# Altium PCB DSP大板子.PcbDoc (part 6 of 9)
Units mil, origin at the board's own origin, x right, y up, seen from the top; angles counter-clockwise.
Board outline 7874.02 x 9055.12 mil, 4 copper layers (Top Layer, GND02, PWR03, Bottom Layer), stack 23.756 mil thick; 656 components, 360 nets, 1967 pads, 2623 vias.
Unrouted connection lines stored in the file: 70.
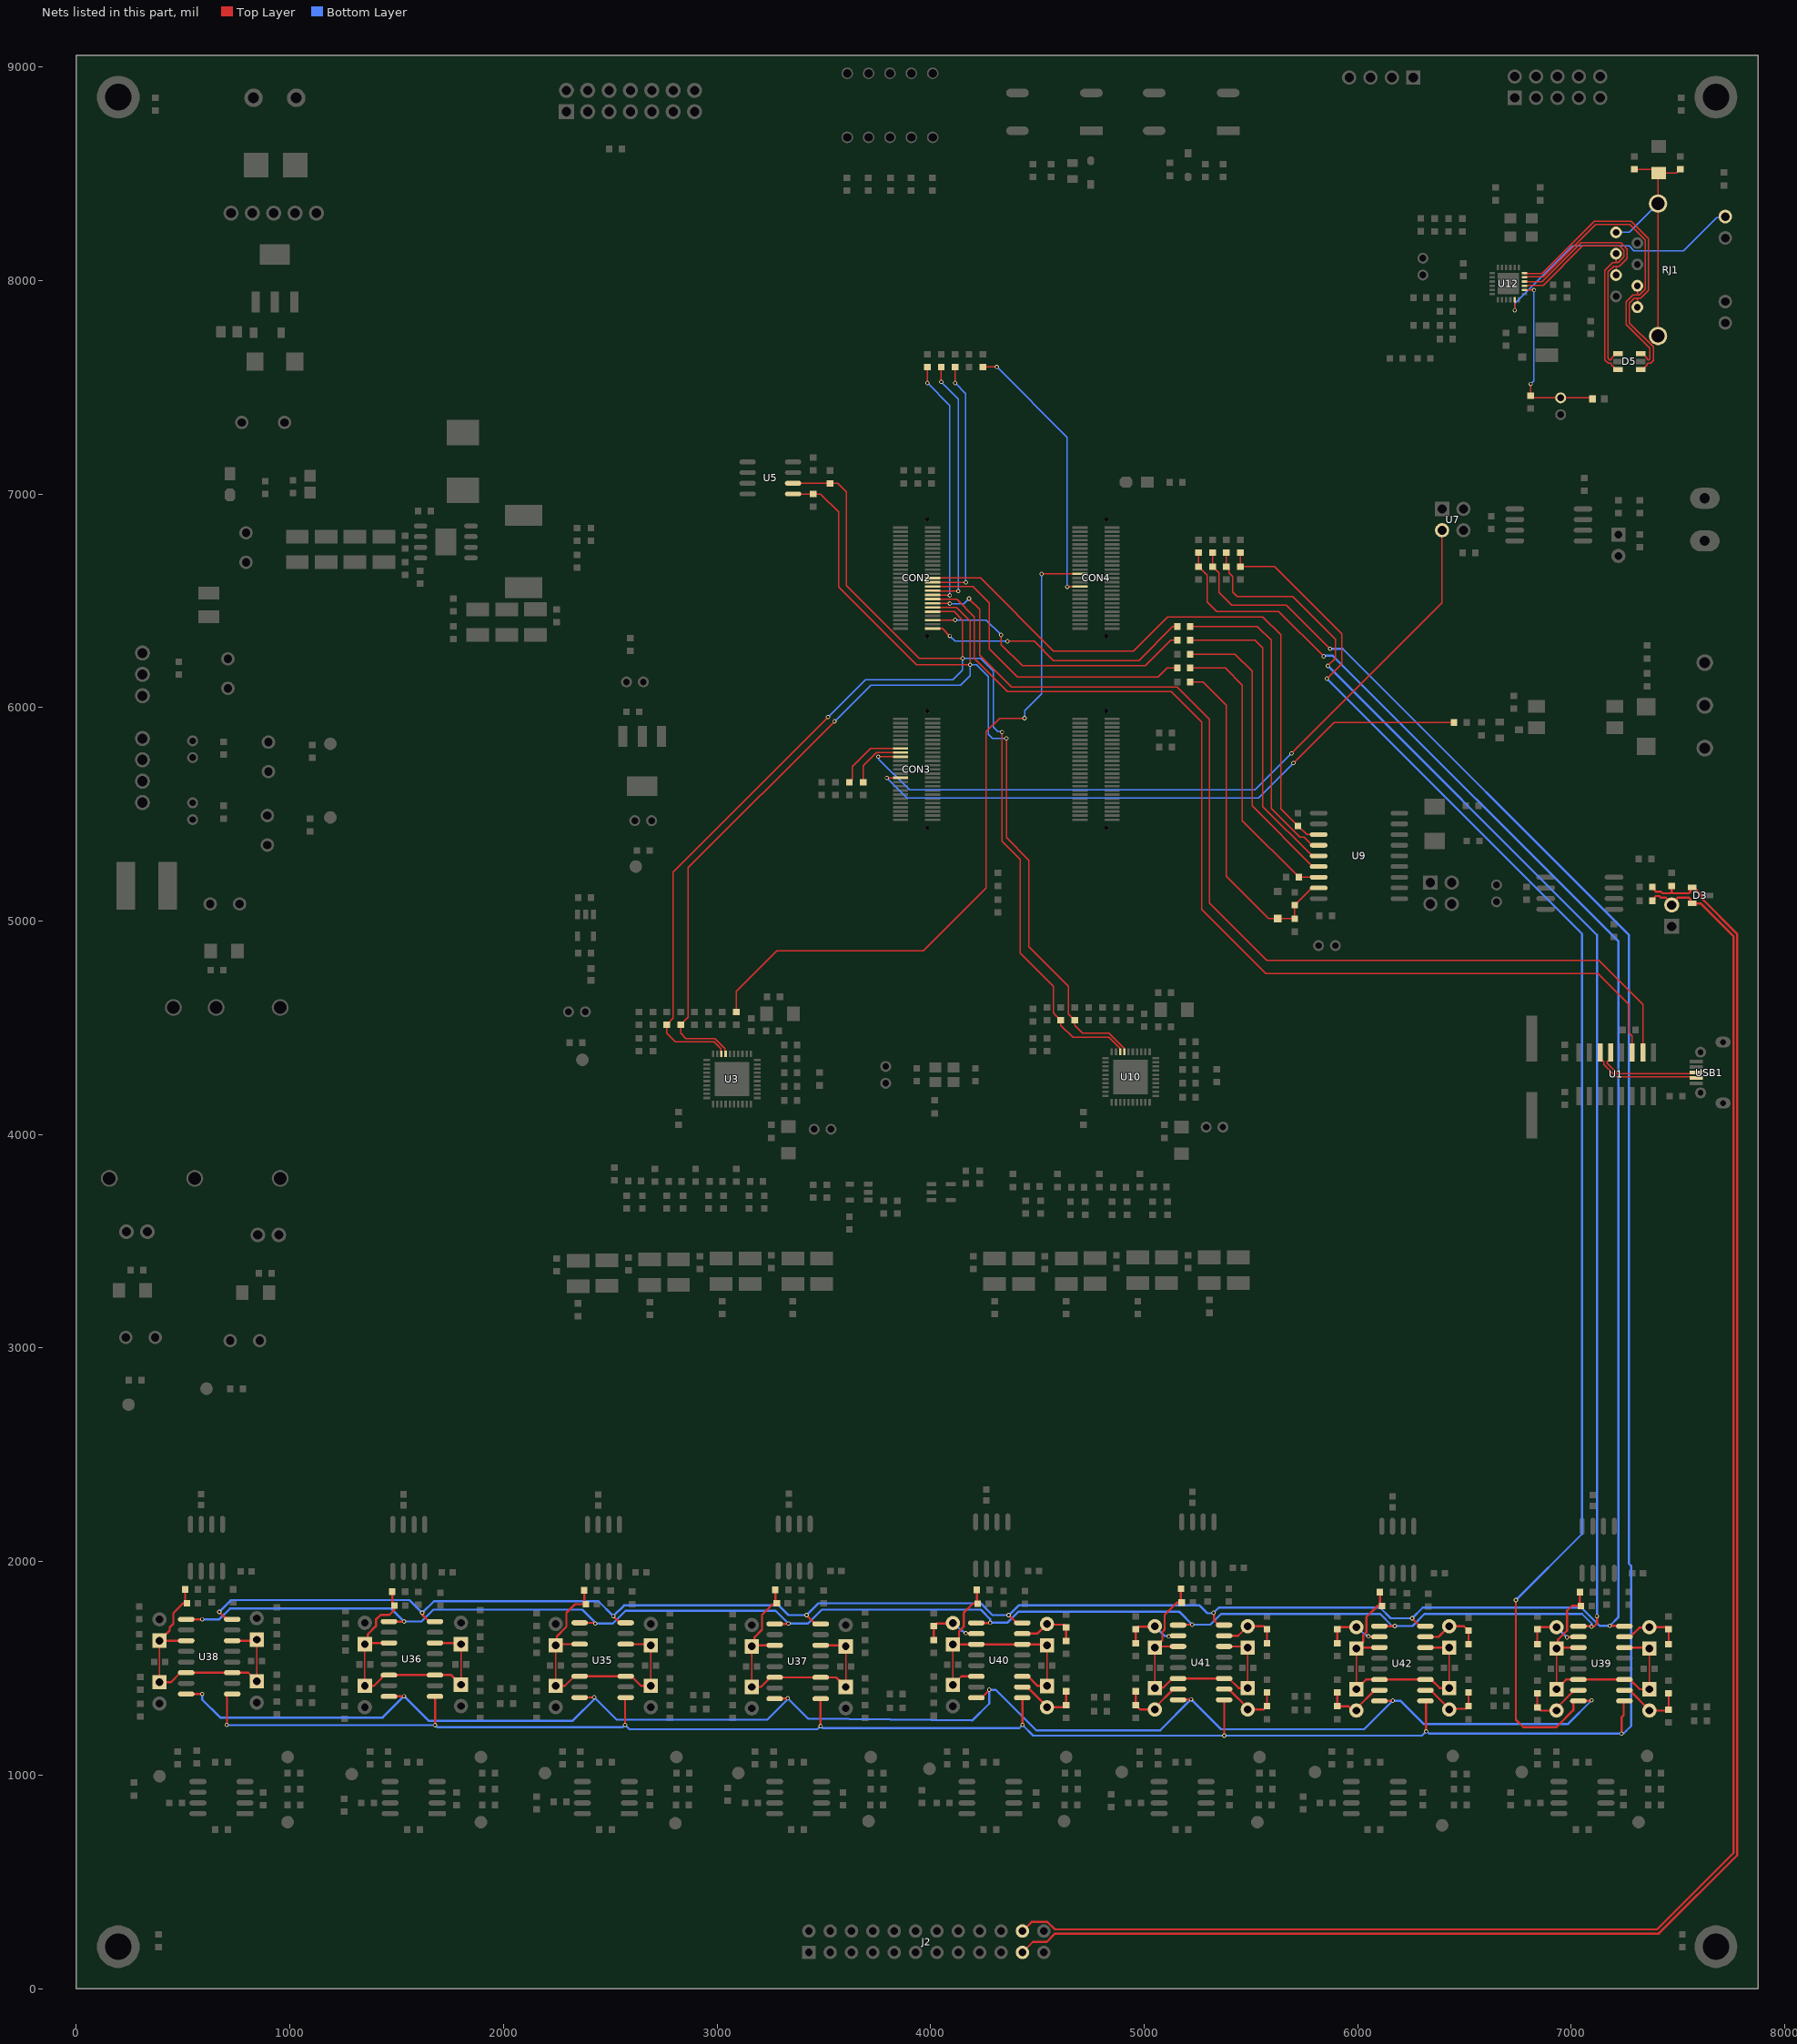
[diagram p5: the nets of this part, all layers, seen from the top]

## Via types
v1: diameter 20, hole 12, Top Layer to Bottom Layer, tented both sides, 2623 vias

## Nets (pads, with @x,y where several pads share a name; then routed paths per layer and width w, separated by ;. In a path a pad name is that pad's centre, name@x,y a point inside that pad or via, vN(x,y) a via of type N, cw(c..) or ccw(c..) an arc to the next point about the centre after c; other vN are vias at no path point) (continued)
C42: JP10.2 R183.2 R184.1 U40.10 | length 291.5
  Top Layer w10: R183.2@4014.76,1632.77 R184.1@4014.76,1697.93 4026.72,1709.89 4101.8,1709.89 JP10.2@4104.76,1712.85 ; v1(4165,1665) 4166.07,1663.93 4213.1,1663.93 U40.10@4214.18,1662.85
  Bottom Layer w10: JP10.2@4104.76,1712.85 4108.45,1712.85 4145.1,1676.21 4150,1676.21 4161.21,1665 v1(4165,1665)
C43: JP18.2 R201.2 R202.1 U40.2 | length 315.7
  Top Layer w10: U40.2@4429.58,1412.85 4453.14,1412.85 4544.76,1321.24 JP18.2@4544.76,1317.85 4624.76,1317.85 R201.2@4634.76,1327.85 R202.1@4634.76,1392.93
C44: JP26.2 R217.2 R218.1 U40.7 | length 295.2
  Top Layer w10: U40.7@4429.58,1662.85 4499.76,1662.85 JP26.2@4544.76,1707.85 4547.8,1704.81 4622.8,1704.81 R218.1@4634.76,1692.85 R217.2@4634.76,1627.7
C51: JP1.2 R165.2 R166.1 U41.15 | length 316.4
  Top Layer w10: R166.1@4960.07,1392.93 R165.2@4960.07,1327.85 4960.85,1327.85 4980.85,1307.85 JP1.2@5050.07,1307.85 5050.07,1316.23 5136.69,1402.85 U41.15@5158.85,1402.85
C52: JP9.2 R181.2 R182.1 U41.10 | length 291.1
  Top Layer w10: R181.2@4960.07,1617.77 R182.1@4960.07,1682.93 4972.03,1694.89 5047.11,1694.89 JP9.2@5050.07,1697.85 ; v1(5115,1650) 5116.43,1651.43 5157.43,1651.43 U41.10@5158.85,1652.85
  Bottom Layer w10: JP9.2@5050.07,1697.85 5096,1651.92 5113.08,1651.92 v1(5115,1650)
C53: JP17.2 R198.2 R199.1 U41.2 | length 315.3
  Top Layer w10: U41.2@5374.25,1402.85 5396.41,1402.85 5485.07,1314.2 JP17.2@5485.07,1307.85 5559.44,1307.85 5574.28,1322.7 R198.2@5575.07,1322.7 R199.1@5575.07,1387.93
C54: JP25.2 R215.2 R216.1 U41.7 | length 290.7
  Top Layer w10: U41.7@5374.25,1652.85 5440.07,1652.85 JP25.2@5485.07,1697.85 5559.36,1697.85 5574.28,1682.93 R216.1@5575.07,1682.93 R215.2@5575.07,1617.85
C61: JP3.2 R169.2 R170.1 U42.15 | length 316.1
  Top Layer w10: R170.1@5903.53,1387.77 R169.2@5903.53,1322.7 5957.04,1322.7 5977.04,1302.7 JP3.2@5993.53,1302.7 5993.53,1311.77 6079.45,1397.7 U42.15@6101.61,1397.7
C62: JP11.2 R185.2 R186.1 U42.10 | length 285.9
  Top Layer w10: R185.2@5903.53,1617.7 R186.1@5903.53,1682.7 5913.53,1692.7 JP11.2@5993.53,1692.7 ; v1(6050,1650) 6051.15,1648.85 6100.46,1648.85 U42.10@6101.61,1647.7
  Bottom Layer w10: JP11.2@5993.53,1692.7 5998.52,1692.7 6030.05,1661.16 6035.05,1661.16 6046.21,1650 v1(6050,1650)
C63: JP19.2 R203.2 R204.1 U42.2 | length 311.7
  Top Layer w10: U42.2@6317.01,1397.7 6341.24,1397.7 6428.53,1310.41 JP19.2@6428.53,1307.7 6431.57,1310.73 6506.57,1310.73 R203.2@6518.53,1322.7 R204.1@6518.53,1387.77
C64: JP27.2 R219.2 R220.1 U42.7 | length 295.6
  Top Layer w10: U42.7@6317.01,1647.7 6378.53,1647.7 JP27.2@6428.53,1697.7 6497.74,1697.7 6517.74,1677.7 R220.1@6518.53,1677.7 R219.2@6518.53,1612.62
C71: JP4.2 R171.2 R172.1 U39.15 | length 312.3
  Top Layer w10: R172.1@6840.6,1382.7 R171.2@6840.6,1317.62 6841.39,1317.62 6856.39,1302.62 JP4.2@6930.6,1302.62 6930.6,1314.35 7003.41,1387.16 7003.41,1391.29 7009.74,1397.62 U39.15@7032.98,1397.62
C72: JP12.2 R187.2 R188.1 U39.10 | length 287.5
  Top Layer w10: R187.2@6840.6,1612.46 R188.1@6840.6,1682.7 6850.52,1692.62 JP12.2@6930.6,1692.62 ; v1(6980,1645) 6981.31,1646.31 7031.67,1646.31 U39.10@7032.98,1647.62
  Bottom Layer w10: JP12.2@6930.6,1692.62 6931.49,1692.62 6979.11,1645 v1(6980,1645)
C73: JP20.2 R205.2 R206.1 U39.2 | length 325.1
  Top Layer w10: U39.2@7248.38,1397.62 7272.96,1397.62 7365.6,1304.98 JP20.2@7365.6,1302.62 7450.68,1302.62 R205.2@7455.6,1307.54 R206.1@7455.6,1382.62
C74: JP28.2 R221.2 R222.1 U39.7 | length 300.1
  Top Layer w10: U39.7@7248.38,1647.62 7275.33,1647.62 7318.35,1690.63 7363.62,1690.63 JP28.2@7365.6,1692.62 7445.68,1692.62 R222.1@7455.6,1682.7 R221.2@7455.6,1612.54
CAN_CS_N: R41.1 R107.2 U9.16 | length 1380.1
  Top Layer w6: R107.2@5214.92,6185 5380,6185 5460,6105 5460,5470.71 5724.92,5205.79 R41.1@5724.92,5205 U9.16@5817.04,5205
CAN_H: D3.1 J2.21 R45.1 R49.2 | length 8413.8
  Top Layer w10: J2.21@4430,170 4479.1,219.1 4544.1,219.1 4583.07,258.07 7409.69,258.07 7776,624.37 7776,4940.33 7610.81,5105.52 7610.81,5119.11 7572.52,5157.4 D3.1@7565.63,5157.4 7564.2,5157.4 7556.41,5149.6 7556.41,5135.86 7550.55,5130 7475.86,5130 7470,5135.86 ; R45.1@7380,5160 7389.96,5150.04 7389.96,5143.36 7395.82,5137.5 7419.51,5137.5 7427.01,5130 7464.14,5130 7470,5135.86 ; R49.2@7470,5165 7470,5135.86
CAN_INT_N: CON2.25 R33.1 U9.12 | length 2914.8
  Top Layer w6: CON2.25@4009.44,6606.36 4233.64,6606.36 4575,6265 4950,6265 5110,6425 5555,6425 5640,6340 5640,5525.08 5707.25,5457.83 5707.25,5457.04 5719.21,5445.08 R33.1@5720,5445.08 ; R33.1@5720.79,5445.08 5760.87,5405 U9.12@5817.04,5405
CAN_L: D3.2 J2.22 R54.1 U8.2 | length 8311.6
  Top Layer w10: J2.22@4430,270 4472.5,312.5 4547.6,312.5 4582.04,278.07 7401.41,278.07 7760,636.66 7760,4927.68 7605.08,5082.6 D3.2@7565.63,5082.6 7564.2,5082.6 7556.41,5090.4 7556.41,5104.14 7550.55,5110 7498.04,5110 U8.2@7470,5081.96 ; R54.1@7379.92,5095 7389.88,5104.96 7389.88,5111.64 7395.74,5117.5 7411.23,5117.5 7418.73,5110 7441.96,5110 U8.2@7470,5081.96 ; U8.2@7470,5075 U8.2@7470,5081.96
CAN_RST_N: C17.2 D2.1 R30.1 R115.2 U9.17 | length 1628.1
  Top Layer w6: R115.2@5214.92,6120 5275,6120 5385,6010 5385,5210 5583.39,5011.61 D2.1@5625,5011.61 5703.23,5011.61 C17.2@5705,5009.84 R30.1@5705,5075.08 ; R30.1@5705.79,5075.08 5785.71,5155 U9.17@5817.04,5155
CAN_SCK: R99.2 U9.13 | length 1488.5
  Top Layer w6: R99.2@5214.92,6380 5530,6380 5595,6315 5595,5526.64 5729.41,5392.23 5749.49,5392.23 5786.73,5355 U9.13@5817.04,5355
CAN_SI: R101.2 U9.14 | length 1456.5
  Top Layer w6: R101.2@5214.92,6315 5215.71,6315.79 5519.21,6315.79 5555,6280 5555,5536.73 5786.73,5305 U9.14@5817.04,5305
CAN_SO: R100.2 U9.15 | length 1383.3
  Top Layer w6: R100.2@5214.92,6250 5425,6250 5505,6170 5505,5540 5790,5255 U9.15@5817.04,5255
CH340_D+: U1.5 USB1.3 | length 499
  Top Layer w6: U1.5@7185,4384.72 7185,4353.23 7176.19,4344.42 7171.51,4344.42 7168,4340.9 7168,4333.88 7216.21,4285.67 7579.62,4285.67 USB1.3@7584.42,4290.47
CH340_D-: U1.6 USB1.2 | length 525.5
  Top Layer w6: U1.6@7135,4384.72 7135,4353.23 7143.81,4344.42 7148.49,4344.42 7152,4340.9 7152,4327.25 7209.58,4269.67 7579.62,4269.67 USB1.2@7584.42,4264.88
CHASSIS_GND: C69.2 R85.1 R96.1 RJ1.8 RJ1.13 RJ1.14 | length 1246.5
  Top Layer w6: R96.1@7295,8520.08 7392.22,8520.08 C69.2@7410,8502.3 ; RJ1.13@7405.94,7739.96 RJ1.14@7405.94,8360.04 7405.94,8498.24 C69.2@7410,8502.3 ; R85.1@7510,8520 7509.21,8520 7491.51,8502.3 C69.2@7410,8502.3
  Bottom Layer w6: RJ1.8@7209.09,8225 7270.9,8225 RJ1.14@7405.94,8360.04
CS0: C153.2 JP8.1 JP16.1 JP24.1 JP32.1 R247.2 U38.3 U38.6 U38.11 U38.14 | length 1417.6
  Top Layer w6: JP8.1@390,1435 JP16.1@390,1630 ; JP24.1@845,1440 JP32.1@845,1635
  Top Layer w10: JP8.1@390,1435 443.05,1435 488.05,1480 U38.14@515,1480 U38.3@730.4,1480 805,1480 JP24.1@845,1440 ; C153.2@510.08,1814.4 R247.2@510.08,1870.08 ; U38.11@515,1630 JP16.1@390,1630 437.45,1677.45 437.45,1692.45 454.44,1709.44 454.44,1759.44 498.91,1803.91 518.24,1803.91 C153.2@519.4,1805.08 ; U38.6@730.4,1630 840,1630 JP32.1@845,1635
CS1: C150.2 JP6.1 JP13.1 JP21.1 JP29.1 R243.2 U36.3 U36.6 U36.11 U36.14 | length 1438.2
  Top Layer w6: JP6.1@1351.23,1418.63 JP13.1@1351.23,1613.63 ; JP21.1@1801.23,1423.63 JP29.1@1801.23,1613.63
  Top Layer w10: JP6.1@1351.23,1418.63 1393.69,1418.63 1431.96,1456.9 1431.96,1458.96 1442.07,1469.07 U36.14@1464.23,1469.07 U36.3@1679.63,1469.07 1755.79,1469.07 JP21.1@1801.23,1423.63 ; JP13.1@1351.23,1613.63 JP13.1@1356.66,1619.07 ; U36.11@1464.23,1619.07 JP13.1@1356.66,1619.07 ; R243.2@1480.08,1860 1480.08,1804.32 C150.2@1489.4,1795 1489.4,1774.4 1466.05,1751.05 1426.05,1751.05 1403,1728 1403,1698 1365,1660 1365,1627.41 JP13.1@1356.66,1619.07 ; U36.6@1679.63,1619.07 1795.79,1619.07 JP29.1@1801.23,1613.63
CS2: C151.2 JP5.1 JP14.1 JP22.1 JP30.1 R244.2 U35.3 U35.6 U35.11 U35.14 | length 1431.7
  Top Layer w6: JP5.1@2244.95,1418.53 JP14.1@2244.95,1608.53 ; JP22.1@2689.95,1418.53 JP30.1@2689.95,1608.53
  Top Layer w10: JP5.1@2244.95,1418.53 2287.41,1418.53 2332.41,1463.53 U35.14@2357.25,1463.53 U35.3@2572.65,1463.53 2599.6,1463.53 2644.6,1418.53 JP22.1@2689.95,1418.53 ; U35.11@2357.25,1613.53 2249.95,1613.53 2249.95,1649.95 2295,1695 2295,1760 2335.54,1800.54 C151.2@2387.29,1800.54 2378.65,1809.18 R244.2@2378.65,1865.54 ; U35.6@2572.65,1613.53 2684.95,1613.53 JP30.1@2689.95,1608.53
CS3: C152.2 JP7.1 JP15.1 JP23.1 JP31.1 R245.2 U37.3 U37.6 U37.11 U37.14 | length 1398.3
  Top Layer w6: JP7.1@3162.9,1413.17 JP15.1@3162.9,1603.17 ; JP23.1@3602.9,1413.17 JP31.1@3602.9,1603.17
  Top Layer w10: JP7.1@3162.9,1413.17 3205.37,1413.17 3239.87,1447.67 3239.87,1450 3248.04,1458.17 U37.14@3270.2,1458.17 U37.3@3485.6,1458.17 3557.9,1458.17 JP23.1@3602.9,1413.17 ; U37.11@3270.2,1608.17 3167.9,1608.17 3175.78,1616.05 3175.78,1645.78 3210.95,1680.95 3210.95,1750.95 3259.51,1799.51 3274.51,1799.51 C152.2@3280,1805 3273.57,1811.43 R245.2@3273.57,1868.23 ; U37.6@3485.6,1608.17 3597.9,1608.17 JP31.1@3602.9,1603.17
CS4: C147.2 JP2.1 JP10.1 JP18.1 JP26.1 R234.2 U40.3 U40.6 U40.11 U40.14 | length 1374.6
  Top Layer w6: JP2.1@4104.76,1422.85 JP10.1@4104.76,1612.85 ; JP18.1@4544.76,1417.85 JP26.1@4544.76,1607.85
  Top Layer w10: JP2.1@4104.76,1422.85 4144.76,1462.85 U40.14@4214.18,1462.85 ; R234.2@4217.02,1868.23 4217.02,1806.88 C147.2@4220.67,1803.23 4198.23,1803.23 4155,1760 4155,1695 4133.22,1673.22 4133.22,1641.32 JP10.1@4104.76,1612.85 U40.11@4214.18,1612.85 4427.15,1612.85 U40.6@4430,1610 ; U40.6@4429.58,1612.85 4539.76,1612.85 JP26.1@4544.76,1607.85 ; U40.3@4456.53,1462.85 4501.53,1417.85 JP18.1@4544.76,1417.85
CS5: C146.2 JP1.1 JP9.1 JP17.1 JP25.1 R233.2 U41.3 U41.6 U41.11 U41.14 | length 1404.3
  Top Layer w6: JP1.1@5050.07,1407.85 JP9.1@5050.07,1597.85 ; JP17.1@5485.07,1407.85 JP25.1@5485.07,1597.85
  Top Layer w10: JP1.1@5050.07,1407.85 5052.18,1409.97 5089.02,1409.97 5131.9,1452.85 U41.14@5158.85,1452.85 U41.3@5374.25,1452.85 5397.6,1452.85 5442.6,1407.85 JP17.1@5485.07,1407.85 ; U41.11@5158.85,1602.85 5055.07,1602.85 5085,1632.79 5085,1670 5096.07,1681.07 5096.07,1751.07 5153.23,1808.23 C146.2@5175.82,1808.23 5171.57,1812.48 R233.2@5171.57,1873.23 ; U41.6@5374.25,1602.85 5480.07,1602.85 JP25.1@5485.07,1597.85
CS6: C148.2 JP3.1 JP11.1 JP19.1 JP27.1 R240.2 U42.3 U42.6 U42.11 U42.14 | length 1389.6
  Top Layer w6: JP3.1@5993.53,1402.7 JP11.1@5993.53,1592.7 ; JP19.1@6428.53,1407.7 JP27.1@6428.53,1597.7
  Top Layer w10: JP3.1@5993.53,1402.7 6038.53,1447.7 U42.14@6101.61,1447.7 U42.3@6317.01,1447.7 6343.96,1447.7 6383.96,1407.7 JP19.1@6428.53,1407.7 ; U42.11@6101.61,1597.7 5998.53,1597.7 6025,1624.17 6025,1655 6040,1670 6040,1740 6092.93,1792.93 C148.2@6114.3,1792.93 6104.38,1802.85 R240.2@6104.38,1857.93 ; U42.6@6317.01,1597.7 JP27.1@6428.53,1597.7
CS7: C149.2 JP4.1 JP12.1 JP20.1 JP28.1 R241.2 U39.3 U39.6 U39.11 U39.14 | length 1400.5
  Top Layer w6: JP4.1@6930.6,1402.62 JP12.1@6930.6,1592.62 ; JP20.1@7365.6,1402.62 JP28.1@7365.6,1592.62
  Top Layer w10: JP4.1@6930.6,1402.62 6975.6,1447.62 U39.14@7032.98,1447.62 U39.3@7248.38,1447.62 7275.33,1447.62 7320.33,1402.62 JP20.1@7365.6,1402.62 ; U39.11@7032.98,1597.62 6935.6,1597.62 6936.57,1598.58 6936.57,1633.44 6980,1676.87 6980,1770 7003.01,1793.01 7040.09,1793.01 C149.2@7044.41,1793.01 7040.09,1797.33 R241.2@7040.09,1858.01 ; U39.6@7248.38,1597.62 7360.6,1597.62 JP28.1@7365.6,1592.62
D4: CON4.28 R31.2 | length 3292.6
  Top Layer w6: R31.2@3090,4574.84 3090,4670 3280,4860 3965,4860 4260,5155 4260,5886.87 4323.13,5950 v1(4440,5950) ; v1(4520,6625) 4520.53,6625.53 4699.47,6625.53 CON4.28@4700,6626.06
  Bottom Layer w6: v1(4440,5950) 4440,5985 4520,6065 v1(4520,6625)
D16: CON3.36 R78.2 | length 341.3
  Top Layer w6: R78.2@3620,5649.84 3620.79,5649.84 3632.75,5661.8 3632.75,5722.75 3718.7,5808.7 CON3.36@3859.84,5808.7
D18: CON3.32 U7.3 | length 3518.4
  Top Layer w6: v1(3755,5770) 3755.6,5769.4 CON3.32@3859.84,5769.4 ; v1(5690,5785) 6395,6490 U7.3@6395,6830
  Bottom Layer w6: v1(3755,5770) 3757.44,5767.56 3757.44,5757.56 3901,5614 5519,5614 v1(5690,5785)
D19: CON3.22 R7.1 | length 2905.9
  Top Layer w6: v1(3795,5670) 3795.45,5670.45 3859.39,5670.45 CON3.22@3859.84,5670.9 ; v1(5698.93,5739.88) 5889.05,5930 R7.1@6450.16,5930
  Bottom Layer w6: v1(3795,5670) 3889,5576 5535.05,5576 v1(5698.93,5739.88)
E4: CON4.22 R112.2 | length 1292.4
  Top Layer w6: R112.2@4245,7595.08 4245.08,7595 v1(4310,7595) ; v1(4640,6565.13) 4640.92,6566.05 4699.08,6566.05 CON4.22@4700,6566.96
  Bottom Layer w6: v1(4310,7595) 4640,7265 v1(4640,6565.13)
E17: CON3.34 R75.2 | length 277.5
  Top Layer w6: R75.2@3685,5649.92 3685,5726.87 3747.13,5789 CON3.34@3859.84,5789
E18: CON2.17 R105.1 | length 1195.2
  Top Layer w6: v1(3985,7520) R105.1@3985,7595.08 ; CON2.17@4009.44,6527.66 4010.77,6526.33 4088.67,6526.33 v1(4090,6525)
  Bottom Layer w6: v1(3985,7520) 4090,7415 v1(4090,6525)
E19: CON2.23 R110.1 | length 1185.7
  Top Layer w6: CON2.23@4009.44,6586.66 4009.79,6586.31 4164.65,6586.31 v1(4165,6585.96) ; v1(4115,7520) R110.1@4115,7595.08
  Bottom Layer w6: v1(4115,7520) 4165,7470 v1(4165,6585.96)
ETH_AVDD3V3: C54.1 C56.1 L1.1 U12.2 | length 847.5
  Top Layer w6: U12.2@6780.1,7955.47 6824.53,7955.47 v1(6825,7955) ; v1@6810,7520 C56.1@6810,7459.92 6819.92,7450 C54.1@6950,7450 7094.9,7450 L1.1@7099.9,7445
  Bottom Layer w6: v1(6810,7515) 6825,7530 v1(6825,7955)
ETH_LED0_N: RJ1.9 U12.23 | length 1265.2
  Top Layer w6: U12.23@6734.53,7909.9 6734.76,7909.67 6734.76,7860.24 v1(6735,7860)
  Bottom Layer w6: v1(6735,7860) 6735,7891.87 7004.69,8161.56 7270.83,8161.56 7293.95,8138.44 7524.35,8138.44 7680.01,8294.11 7724.11,8294.11 RJ1.9@7730,8300
ETH_RXM: D5.6 RJ1.6 U12.3 | length 1241
  Top Layer w6: U12.3@6780.1,7975.16 6781.94,7977 6868.72,7977 7053.28,8161.56 7224.24,8161.56 7245.65,8140.14 7245.65,8109.86 7218.8,8083 7212.61,8083 7209.09,8086.51 ; RJ1.6@7209.09,8125 7209.09,8086.51 ; D5.6@7218.7,7582.6 7208.86,7582.6 7188.05,7603.41 7188.05,7608.49 7184.53,7612 7172.93,7612 7156.53,7628.4 7156.53,8046.77 7192.76,8083 7205.58,8083 7209.09,8086.51
ETH_RXP: D5.4 RJ1.4 U12.4 | length 1241
  Top Layer w6: U12.4@6780.1,7994.84 6781.94,7993 6862.09,7993 7046.65,8177.56 7230.86,8177.56 7261.65,8146.77 7261.65,8103.23 7225.42,8067 7212.61,8067 7209.09,8063.49 ; RJ1.4@7209.09,8025 7209.09,8063.49 ; D5.4@7218.7,7657.4 7208.86,7657.4 7188.05,7636.59 7188.05,7631.51 7184.53,7628 7179.56,7628 7172.53,7635.03 7172.53,8040.14 7199.39,8067 7205.58,8067 7209.09,8063.49
ETH_TXM: D5.3 RJ1.3 U12.5 | length 1457.1
  Top Layer w6: U12.5@6780.1,8014.53 6781.94,8016.37 6868.49,8016.37 7113.68,8261.56 7274.24,8261.56 7345.65,8190.14 7345.65,7959.86 7318.8,7933 7312.61,7933 7309.09,7936.51 ; RJ1.3@7309.09,7975 7309.09,7936.51 ; D5.3@7325,7657.4 7334.84,7657.4 7355.65,7636.59 7355.65,7631.51 7359.17,7628 7364.14,7628 7367.65,7631.51 7367.65,7682.49 7256.53,7793.6 7256.53,7900.52 7289.01,7933 7305.58,7933 7309.09,7936.51
ETH_TXP: D5.1 RJ1.1 U12.6 | length 1510.1
  Top Layer w6: U12.6@6780.1,8034.21 6781.94,8032.37 6861.87,8032.37 7107.05,8277.56 7280.86,8277.56 7361.65,8196.77 7361.65,7953.23 7325.42,7917 7312.61,7917 7309.09,7913.49 ; RJ1.1@7309.09,7875 7309.09,7913.49 ; D5.1@7325,7582.6 7334.84,7582.6 7355.65,7603.41 7355.65,7608.49 7359.17,7612 7370.77,7612 7383.65,7624.89 7383.65,7689.11 7272.53,7800.23 7272.53,7893.9 7295.64,7917 7305.58,7917 7309.09,7913.49
F16: CON2.15 U1.3 | length 4906.1
  Top Layer w6: CON2.15@4009.44,6507.96 4011.41,6506 4124,6506 4205,6425 4205,6230 4360,6075 5126.87,6075 5270,5931.87 5270,5055 5570,4755 7125,4755 7270,4610 7270,4476.48 7285,4461.48 U1.3@7285,4384.72
F17: CON2.13 U1.2 | length 4979.3
  Top Layer w6: CON2.13@4009.44,6488.26 4010.07,6487.63 4089.37,6487.63 v1(4090,6487) ; v1(4180,6510) 4230,6460 4230,6245 4380,6095 5155,6095 5305,5945 5305,5085 5575,4815 7130,4815 7335,4610 U1.2@7335,4384.72
  Bottom Layer w6: v1(4090,6487) 4092,6485 4155,6485 v1(4180,6510)
F18: CON2.21 R107.1 | length 1464.6
  Top Layer w6: CON2.21@4009.44,6566.96 4198.04,6566.96 4275,6490 4275,6275 4407,6143 5065.05,6143 5107.05,6185 R107.1@5155.08,6185
F19: CON2.19 R106.1 | length 1204.7
  Top Layer w6: CON2.19@4009.44,6547.26 4010.57,6546.13 4128.87,6546.13 v1(4130,6545) ; v1(4050,7525) R106.1@4050,7595.08
  Bottom Layer w6: v1(4050,7525) 4130,7445 v1(4130,6545)
G16: CON2.9 R21.2 R38.2 R61.2 U3.18 U5.6 U10.18 | length 6912.2
  Top Layer w6: U3.18@3020.8,4378.2 3019.02,4379.98 3019.02,4402.95 2986.97,4435 2805,4435 2765,4475 R21.2@2765,4515.08 2765.79,4515.08 2795,4544.29 2795,5230 v1(3520,5955) ; U5.6@3356.5,7050 R38.2@3530,7050 3565,7050 3605,7010 3605,6570.93 3945.93,6230 v1(4150,6230) 4150,6410 4111.14,6448.86 CON2.9@4009.44,6448.86 ; v1(4335,5885) 4335,5373 4420,5288 4420,4850 4575,4695 4575,4570 4586.12,4558.88 4586.12,4558.17 4609.21,4535.08 R61.2@4610,4535.08 ; R61.2@4610,4535 4610,4511.12 4666.12,4455 4835.23,4455 4885.25,4404.98 4885.25,4390.7 U10.18@4887.75,4388.2
  Bottom Layer w6: v1(3520,5955) 3695,6130 4105,6130 4150,6175 v1(4150,6230) 4235,6230 4295,6170 4295,5908.13 4316,5887.13 4332.87,5887.13 v1(4335,5885)
G17: CON2.5 R101.1 | length 1311
  Top Layer w6: CON2.5@4009.44,6409.46 4009.71,6409.73 4114.73,6409.73 v1(4115,6410) ; v1(4330,6340) 4330,6295 4430,6195 5005,6195 5125,6315 R101.1@5155.08,6315
  Bottom Layer w6: v1(4115,6410) 4260,6410 v1(4330,6340)
G18: CON2.11 R22.2 R40.2 R62.2 U3.17 U5.5 U10.17 | length 6806.5
  Top Layer w6: U3.17@3040.5,4378.2 3038,4380.7 3038,4402 2990,4450 2855,4450 2830,4475 R22.2@2830,4515.16 2830.79,4515.16 2865,4549.37 2865,5250 v1(3550,5935) ; U5.5@3356.5,7000 3449.84,7000 R40.2@3450,6999.84 3485.16,6999.84 3570,6915 3570,6565 3935,6200 v1(4185,6200) 4185,6405 4122,6468 4082.13,6468 4081.57,6468.56 CON2.11@4009.44,6468.56 ; v1(4355,5855) 4355,5390 4460,5285 4460,4880 4645,4695 4645,4564.37 4674.21,4535.16 R62.2@4675,4535.16 ; R62.2@4675,4534.37 4675,4511.2 4711.2,4475 4834.93,4475 4904.95,4404.98 4904.95,4390.7 U10.17@4907.45,4388.2
  Bottom Layer w6: v1(3550,5935) 3720,6105 4140,6105 4185,6150 v1(4185,6200) 4215,6200 4270,6145 4270,5875 4290,5855 v1(4355,5855)
G19: CON2.1 R99.1 | length 1274.1
  Top Layer w6: CON2.1@4009.44,6370.16 4054.84,6370.16 v1(4090,6335) ; v1(4360,6310) 4485,6310 4575,6220 4975,6220 5134.21,6379.21 5154.29,6379.21 R99.1@5155.08,6380
  Bottom Layer w6: v1(4090,6335) 4115,6310 v1(4360,6310)
GAIN_X1: R124.1 R125.2 U35.8 U36.8 U37.8 U38.8 U39.8 U40.8 U41.8 U42.8 | length 13501.8
  Top Layer w6: R125.2@5255,6659.92 R124.1@5255,6725.08 ; R125.2@5255.79,6659.92 5267.75,6647.96 5267.75,6647.17 5295.25,6619.67 5295.25,6494.75 5340,6450 5630,6450 v1(5840,6240)
  Top Layer w10: v1(670,1765) 670,1763.45 703.45,1730 U38.8@730.4,1730 ; v1(1620,1760) 1621.91,1758.09 1621.91,1749.83 1652.68,1719.07 U36.8@1679.63,1719.07 ; v1(2515,1745) 2515,1744.61 2546.09,1713.53 U35.8@2572.65,1713.53 ; v1(3420,1750) 3420,1748.41 3460.24,1708.17 U37.8@3485.6,1708.17 ; v1(4365,1750) 4365.24,1750 4402.39,1712.85 U40.8@4429.58,1712.85 ; v1(5325,1760) 5326.66,1758.34 5326.66,1725.92 5349.72,1702.85 U41.8@5374.25,1702.85 ; v1(6255,1735) 6255,1733.88 6291.18,1697.7 U42.8@6317.01,1697.7 ; v1(7180,1700) 7246,1700 U39.8@7248.38,1697.62
  Bottom Layer w6: v1(5840,6240) v1@5842.68,6242.68
  Bottom Layer w10: v1(670,1765) 725,1820 1560,1820 v1(1620,1760) 1675,1815 2445,1815 v1(2515,1745) 2565,1795 3290,1795 3335,1750 v1(3420,1750) 3475,1805 4235,1805 4290,1750 v1(4365,1750) 4367.24,1750 4412.24,1795 5260,1795 5296.76,1758.24 5323.24,1758.24 v1(5325,1760) 5350,1785 6104.67,1785 6154.67,1735 v1(6255,1735) 6305,1785 7047.16,1785 7132.16,1700 v1(7180,1700) 7221,1741 7221,4904 5882.32,6242.68 v1@5842.68,6242.68
GAIN_X10: R121.1 R122.1 U35.1 U36.1 U37.1 U38.1 U39.1 U40.1 U41.1 U42.1 | length 14303.8
  Top Layer w6: R122.1@5320,6725.16 R121.1@5320,6659.92 5320.79,6659.92 5332.75,6647.96 5332.75,6647.17 5350,6629.92 5350,6540 5410,6480 5665,6480 v1(5870,6275)
  Top Layer w10: v1(705,1235) 705.73,1235.72 705.73,1371.82 713.9,1380 U38.1@730.4,1380 ; U36.1@1679.63,1369.07 1680,1368.69 v1(1680,1234) ; v1(2570,1235) 2570,1360.88 U35.1@2572.65,1363.53 ; v1(3485,1230) 3485,1357.57 U37.1@3485.6,1358.17 ; U40.1@4429.58,1362.85 4430,1362.43 v1(4430,1235) ; U41.1@5374.25,1352.85 5375,1352.1 v1(5375,1185) ; U42.1@6317.01,1347.7 6320,1344.7 v1(6320,1205) ; v1(7235,1195) 7235,1270.7 7245,1280.7 7245,1344.24 U39.1@7248.38,1347.62
  Bottom Layer w10: v1(705,1235) 705.5,1234.5 1679.5,1234.5 v1(1680,1234) ; v1@1680,1235 1680.86,1235 1690.86,1225 2559.14,1225 v1@2569.14,1235 ; v1(2570,1235) 2590,1215 3470,1215 v1(3485,1230) 3485.86,1230 3495.86,1220 4415,1220 v1(4430,1235) 4480,1185 6300,1185 v1(6320,1205) 6321.91,1203.09 6325.7,1203.09 6333.79,1195 v1(7235,1195) 7236.91,1196.91 7246.4,1196.91 7256.7,1207.21 7280,1230.51 7280,1980.3 7269,1991.3 7269,4936 5930,6275 v1(5870,6275)
GAIN_X30: R118.1 R119.1 U35.9 U36.9 U37.9 U38.9 U39.9 U40.9 U41.9 U42.9 | length 13365.9
  Top Layer w6: R119.1@5385,6725.08 R118.1@5385,6660 5385.79,6660 5397.75,6648.04 5397.75,6630.85 5414.14,6614.46 5414.14,6540.86 5435,6520 5695,6520 5895,6320 5895,6230 v1(5860,6195)
  Top Layer w10: U38.9@515,1730 v1(590,1730) ; U36.9@1464.23,1719.07 1534.07,1719.07 v1(1535,1720) ; U35.9@2357.25,1713.53 2426.47,1713.53 v1(2430,1710) ; U37.9@3270.2,1708.17 3333.17,1708.17 v1(3335,1710) ; U40.9@4214.18,1712.85 4277.85,1712.85 v1@4280,1715 ; U41.9@5158.85,1702.85 5161,1705 v1(5225,1705) ; U42.9@6101.61,1697.7 6172.7,1697.7 v1@6175,1700 ; U39.9@7032.98,1697.62 7092.38,1697.62 v1(7095,1695) 7097.43,1697.43 7107.43,1697.43 7120,1710 v1(7120,1745)
  Bottom Layer w10: v1(590,1730) 670,1730 720,1780 1475,1780 v1(1535,1720) 1616.87,1720 1671.87,1775 2370,1775 2425.06,1719.93 2425.06,1718.72 2430,1713.79 v1(2430,1710) 2511.87,1710 2571.87,1770 3275,1770 v1(3335,1710) 3425.63,1710 3490.63,1775 4235,1775 4278.93,1731.07 v1(4278.93,1713.93) 4358.93,1713.93 4410,1765 5165,1765 5167.93,1762.07 v1(5225,1705) 5310,1705 5360,1755 6105,1755 6160.07,1699.93 6172.76,1699.93 v1(6173.85,1698.85) 6256.47,1698.85 6312.62,1755 7050,1755 7095,1710 v1(7095,1695) ; v1(5860,6195) 7120,4935 v1(7120,1745)
GAIN_X99: R116.1 R117.1 U35.16 U36.16 U37.16 U38.16 U39.16 U40.16 U41.16 U42.16 | length 14602.7
  Top Layer w6: R117.1@5450,6725.08 R116.1@5450,6659.92 5610.08,6659.92 5925,6345 5925,6205 v1(5855,6135)
  Top Layer w10: U38.16@515,1380 v1(590,1380) ; U36.16@1464.23,1369.07 1464.7,1369.53 1534.53,1369.53 v1(1535,1370) ; U35.16@2357.25,1363.53 2357.99,1364.26 2424.26,1364.26 v1(2425,1365) ; U37.16@3270.2,1358.17 3271.38,1359.35 3329.65,1359.35 v1(3330.82,1360.52) ; U40.16@4214.18,1362.85 4244.84,1362.85 4244.78,1362.9 4244.78,1368.15 4275,1398.36 v1(4275,1400) ; U41.16@5158.85,1352.85 5161,1355 v1(5220,1355) ; U42.16@6101.61,1347.7 6162.7,1347.7 v1@6165,1350 ; v1(6740,1820) 6740,1260 6775,1225 6930,1225 7009.03,1304.03 7009.03,1339.44 7017.2,1347.62 U39.16@7032.98,1347.62 7092.62,1347.62 v1(7095,1350)
  Bottom Layer w10: v1(590,1380) 590,1353.94 673.94,1270 1435,1270 v1(1535,1370) 1650,1255 2325,1255 v1@2430,1360 ; v1(2425,1365) v1@2430,1360 ; v1(3330.82,1360.52) v1@3333.17,1358.17 ; v1(5855,6135) 7050,4940 7050,2130 v1(6740,1820) ; v1(7095,1350) 6985,1240 6308.13,1240 6199.28,1348.85 v1(6163.85,1348.85) 6030,1215 5360,1215 v1(5220,1355) 5075,1210 4495,1210 4305,1400 v1(4275,1400) 4275,1335 4197.1,1257.1 4192.92,1257.1 3426.92,1264.43 3424.03,1267.32 v1@3333.17,1358.17 ; v1@2430,1360 2530,1260 3235,1260 v1@3333.17,1358.17